# Altium PCB 16MV1.PcbDoc (part 3 of 3)
Units mm, origin at the board's own origin, x right, y up, seen from the top; angles counter-clockwise.
Board outline 48 x 32 mm, 4 copper layers (Top Layer, Layer 1, Layer 2, Bottom Layer), stack 1.743 mm thick; 202 components, 160 nets, 784 pads, 427 vias.
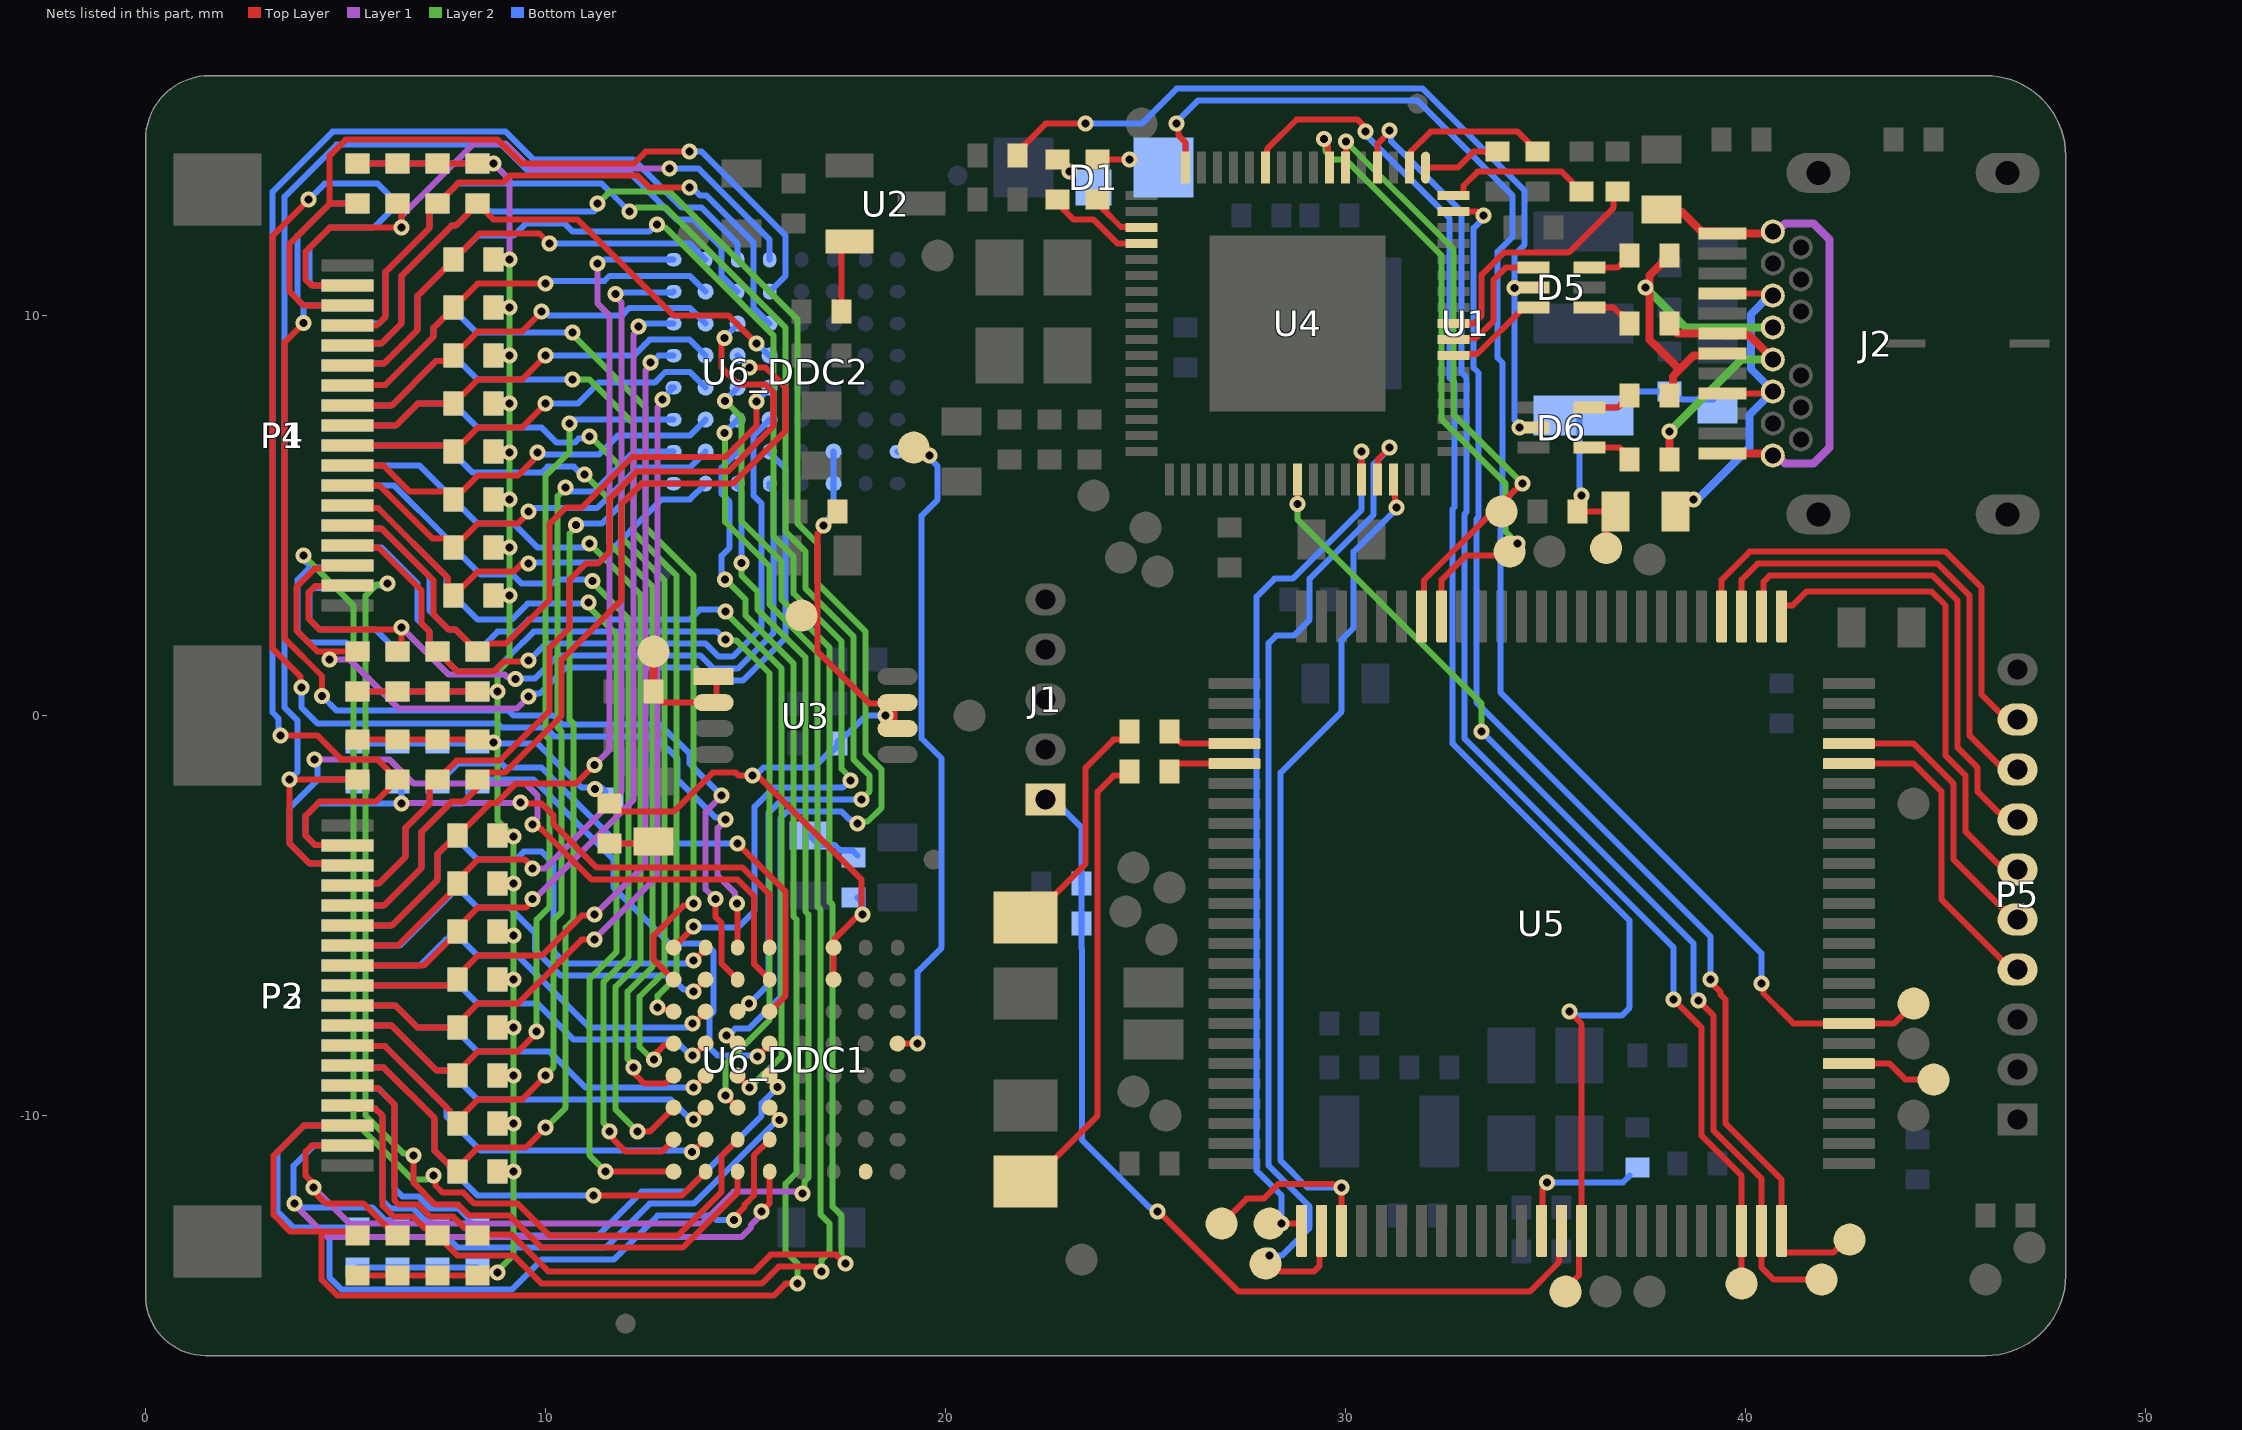
[diagram p4: the nets of this part, all layers, seen from the top]

## Via types
v1: diameter 0.4, hole 0.2, Top Layer to Bottom Layer, tented both sides, 427 vias

## Nets (pads, with @x,y where several pads share a name; then routed paths per layer and width w, separated by ;. In a path a pad name is that pad's centre, name@x,y a point inside that pad or via, vN(x,y) a via of type N, cw(c..) or ccw(c..) an arc to the next point about the centre after c; other vN are vias at no path point) (continued)
NetC39_DDC1_1: C39_DDC1.1 R51_DDC1.1 | length 1.4
  Bottom Layer w0.15: C39_DDC1.1@16.599,-3 16.833,-3.234 17.234,-3.234 17.375,-3.375 17.675,-3.375 R51_DDC1.1@17.8,-3.5
NetC39_DDC2_1: C39_DDC2.1 R51_DDC2.1 | length 1
  Top Layer w0.15: R51_DDC2.1@11.6,-3.2 C39_DDC2.1@12.6,-3.2
NetD1_2: D1.2 R7.1 | length 0.5
  Top Layer w0.15: R7.1@22.8,13.9 22.85,13.9 23.1,13.65 v1(23.1,13.6)
NetD1_3: D1.3 R6.1 | length 0.8
  Top Layer w0.15: R6.1@23.8,13.9 v1(24.6,13.9)
NetD3_1: D3.1 R12.1 | length 5.7
  Top Layer w0.15: D3.1@22,-5.05 22.15,-5.05 22.725,-4.475 23.5,-3.7 23.5,-1.3 24.2,-0.6 R12.1@24.5,-0.6
NetD4_1: D4.1 R13.1 | length 10.9
  Top Layer w0.15: D4.1@22.5,-11.3 22.725,-11.075 23.8,-10 23.8,-1.9 24.2,-1.5 R13.1@24.6,-1.5
NetD5_1: D5.1 R52.1 | length 1.1
  Top Layer w0.15: D5.1@36.1,10.2 36.7,10.2 36.875,10.025 36.925,10.025 37,9.95 R52.1@37,9.9
NetD5_3: D5.3 R53.1 | length 1
  Top Layer w0.15: D5.3@36.1,11.2 36.8,11.2 36.875,11.275 36.925,11.275 37,11.35 R53.1@37,11.4
NetD5_4: D5.4 U4.59 | length 3.1
  Top Layer w0.15: U4.59@32.7,9.4 32.735,9.435 33.259,9.435 33.7,9.876 33.7,10.9 34,11.2 D5.4@34.5,11.2
NetD5_6: D5.6 U4.58 | length 2.4
  Top Layer w0.15: U4.58@32.7,9 32.735,9.035 33.285,9.035 34.45,10.2 D5.6@34.6,10.2
NetD6_1: D6.1 R54.1 | length 0.9
  Top Layer w0.15: D6.1@36.1,6.7 36.85,6.7 36.95,6.6 R54.1@37,6.6
NetD6_3: D6.3 R55.1 | length 1
  Top Layer w0.15: D6.3@36.1,7.7 36.8,7.7 36.875,7.775 36.925,7.775 37,7.85 R55.1@37,7.9
NetFB1_1: FB1.1 J2.A1 J2.A12 J2.B1 J2.B12 | length 12.6
  Top Layer w0.2: FB1.1@37.9,12.6 38.4,12.6 38.9,12.1 39.37,12.1 J2.A12@39.42,12.05 40.55,12.05 J2.B1@40.6,12 ; J2.A1@39.42,6.55 40.55,6.55 J2.B12@40.6,6.5
  Layer 1 w0.2: J2.B12@40.68,6.5 40.788,6.5 40.988,6.3 41.7,6.3 42.1,6.7 42.1,11.9 41.7,12.3 40.988,12.3 40.865,12.177 40.723,12.177 J2.B1@40.7,12.2
NetFB2_2: FB2.2 J2.A4 J2.A9 J2.B4 J2.B9 | length 8.9
  Top Layer w0.15: J2.A4@39.42,8.05 40.55,8.05 J2.B9@40.6,8.1 ; J2.A9@39.42,10.55 40.55,10.55 J2.B4@40.6,10.5
  Layer 1 w0.2: J2.B9@40.603,8.177 J2.B9@40.68,8.1
  Bottom Layer w0.2: v1(38.7,5.4) 38.8,5.4 40.1,6.7 40.1,7.52 J2.B9@40.68,8.1 40.68,8.122 40.13,8.672 40.13,10.03 J2.B4@40.6,10.5
NetP1_2: P1.2 R18_DDC2.1 U6_DDC2.H4 | length 16.8
  Top Layer w0.15: P1.2@5.05,10.75 4.15,10.75 4,10.9 4,11.6 4.6,12.2 v1(6.4,12.2) ; R18_DDC2.1@6.3,12.8 6.4,12.7 6.4,12.288 v1@6.356,12.244
  Layer 1 w0.15: v1(6.4,12.2) 6.401,12.501 8.2,14.3 9,14.3 9.625,13.675 v1(13.1,13.675)
  Bottom Layer w0.15: v1(13.1,13.675) 13.825,13.675 15.6,11.9 U6_DDC2.H4@15.6,11.4
NetP1_3: P1.3 R19_DDC2.1 U6_DDC2.G4 | length 20.4
  Top Layer w0.15: P1.3@5.05,10.25 3.95,10.25 3.6,10.6 3.6,11.8 4.6,12.8 ; R19_DDC2.1@5.2,12.8 4.6,12.8 ; v1(13.6,14.1) 12.5,14.1 12.2,13.8 9.4,13.8 8.8,14.4 5,14.4 4.6,14 4.6,12.8
  Bottom Layer w0.15: v1(13.6,14.1) 13.901,14.099 16,12 16,11 U6_DDC2.G4@15.6,10.6
NetP1_4: P1.4 R20_DDC2.1 U6_DDC2.F4 | length 15.5
  Top Layer w0.15: P1.4@5.05,9.75 5.054,9.754 5.778,9.754 6,9.976 6,11.1 7.1,12.2 7.1,12.65 7.25,12.8 R20_DDC2.1@7.3,12.8 7.35,12.8 7.525,12.975 7.525,13.025 7.825,13.325 8.925,13.325 9.1,13.5 12.3,13.5 12.6,13.2 v1(13.601,13.201)
  Bottom Layer w0.15: v1(13.601,13.201) 13.668,13.201 13.869,13 14.024,13 15.2,11.824 15.2,10.2 U6_DDC2.F4@15.6,9.8
NetP1_5: P1.5 R21_DDC2.1 U6_DDC2.E4 | length 14.3
  Top Layer w0.15: P1.5@5.05,9.25 5.1,9.3 5.89,9.3 6.4,9.81 6.4,11 7.65,12.25 7.75,12.25 8.1,12.6 8.1,12.65 R21_DDC2.1@8.25,12.8 ; R21_DDC2.1@8.3,12.8 R21_DDC2.1@8.4,12.9 ; R21_DDC2.1@8.4,12.7 8.45,12.7 8.525,12.625 8.525,12.575 8.7,12.4 10.8,12.4 13.2,10 14.574,10 v1(15.275,9.299) v1@15.3,9.324
  Bottom Layer w0.15: v1(15.275,9.299) 15.288,9.299 15.587,9 U6_DDC2.E4@15.6,9
NetP1_6: P1.6 R22_DDC2.1 U6_DDC2.H2 | length 11
  Top Layer w0.15: P1.6@5.05,8.75 5.1,8.8 5.956,8.8 6.8,9.644 6.8,10.5 7.475,11.175 7.525,11.175 7.6,11.25 R22_DDC2.1@7.6,11.3 ; R22_DDC2.1@7.7,11.4 7.7,11.45 7.875,11.625 7.925,11.625 8.352,12.052 9.848,12.052 v1(10.1,11.8)
  Bottom Layer w0.15: v1(10.1,11.8) 13.6,11.8 U6_DDC2.H2@14,11.4
NetP1_7: P1.7 R23_DDC2.1 U6_DDC2.G2 | length 10.4
  Top Layer w0.15: P1.7@5.05,8.25 5.062,8.262 5.983,8.262 7.2,9.479 7.2,9.7 7.5,10 7.55,10 7.7,10.15 R23_DDC2.1@7.7,10.2 7.7,10.25 7.875,10.425 7.925,10.425 8.3,10.8 v1(10,10.8)
  Bottom Layer w0.15: v1(10,10.8) 10.071,10.871 11.472,10.871 11.596,10.995 13.605,10.995 U6_DDC2.G2@14,10.6
NetP1_8: P1.8 R24_DDC2.1 U6_DDC2.F2 | length 10.2
  Top Layer w0.15: P1.8@5.05,7.75 6.15,7.75 7.267,8.867 7.667,8.867 R24_DDC2.1@7.7,8.9 ; R24_DDC2.1@7.7,9 7.7,9.05 7.875,9.225 7.925,9.225 8.3,9.6 9.4,9.6 v1(9.9,10.1)
  Bottom Layer w0.15: v1(9.9,10.1) 9.968,10.1 10.068,10 11.9,10 12.095,10.195 13.605,10.195 U6_DDC2.F2@14,9.8
NetP1_9: P1.9 R25_DDC2.1 U6_DDC2.E2 | length 10
  Top Layer w0.15: P1.9@5.05,7.25 6.25,7.25 6.8,7.8 R25_DDC2.1@7.7,7.8 7.7,7.85 7.875,8.025 7.925,8.025 8.3,8.4 9.4,8.4 v1(10,9)
  Bottom Layer w0.15: v1(10,9) 12.2,9 12.475,9.275 ; 12.476,9.275 12.601,9.4 13.6,9.4 U6_DDC2.E2@14,9
NetP1_10: P1.10 R26_DDC2.1 U6_DDC2.D2 | length 10
  Top Layer w0.15: P1.10@5.05,6.75 7.55,6.75 R26_DDC2.1@7.7,6.6 7.7,6.65 7.875,6.825 7.925,6.825 8.3,7.2 9.4,7.2 v1(10,7.8)
  Bottom Layer w0.15: v1(10,7.8) 10.8,7.8 11.325,8.325 12.727,8.325 12.997,8.595 13.605,8.595 U6_DDC2.D2@14,8.2
NetP1_11: P1.11 R27_DDC2.1 U6_DDC2.C2 | length 10.1
  Top Layer w0.15: P1.11@5.05,6.25 5.95,6.25 6.6,5.6 7.55,5.6 7.6,5.55 R27_DDC2.1@7.6,5.5 ; R27_DDC2.1@7.7,5.4 7.7,5.45 7.875,5.625 7.925,5.625 8.3,6 9.3,6 9.699,6.399 9.699,6.432 9.8,6.532 v1(9.8,6.575)
  Bottom Layer w0.15: v1(9.8,6.575) 9.848,6.527 10.149,6.527 10.151,6.525 11.325,6.525 11.8,7 13.6,7 U6_DDC2.C2@14,7.4
NetP1_12: P1.12 R28_DDC2.1 U6_DDC2.B2 | length 10.5
  Top Layer w0.15: P1.12@5.05,5.75 5.85,5.75 7.175,4.425 7.525,4.425 7.6,4.35 R28_DDC2.1@7.6,4.3 ; R28_DDC2.1@7.7,4.2 7.7,4.25 7.875,4.425 7.925,4.425 8.3,4.8 9.3,4.8 9.575,5.075 v1(9.575,5.1)
  Bottom Layer w0.15: v1(9.575,5.1) 9.6,5.1 9.689,5.189 11.289,5.189 12.3,6.2 13.6,6.2 U6_DDC2.B2@14,6.6
NetP1_13: P1.13 R29_DDC2.1 U6_DDC2.A2 | length 11.2
  Top Layer w0.15: P1.13@5.05,5.25 5.109,5.191 5.809,5.191 7.566,3.434 7.566,3.134 R29_DDC2.1@7.7,3 ; R29_DDC2.1@7.7,3.05 7.85,3.2 7.9,3.2 8.3,3.6 9.2,3.6 9.4,3.8 v1(9.575,3.8)
  Bottom Layer w0.15: v1(9.575,3.8) 9.6,3.825 11.325,3.825 12.905,5.405 13.605,5.405 U6_DDC2.A2@14,5.8
NetP1_14: P1.14 R30_DDC2.1 U6_DDC2.D4 | length 16.6
  Top Layer w0.15: P1.14@5.05,4.75 5.125,4.675 5.901,4.675 7.2,3.376 7.2,2.526 7.576,2.15 7.75,2.15 8.075,1.825 8.075,1.775 8.25,1.6 R30_DDC2.1@8.3,1.6 8.475,1.775 8.588,1.775 8.613,1.8 9.006,1.8 10.1,2.894 10.1,4.8 10.5,5.2 10.9,5.2 12.16,6.46 14.487,6.46 15.275,7.248 v1(15.275,7.85)
  Bottom Layer w0.15: v1(15.275,7.85) 15.275,7.862 15.6,8.187 U6_DDC2.D4@15.6,8.2
NetP1_15: P1.15 R31_DDC2.1 U6_DDC2.C4 | length 18.4
  Top Layer w0.15: P1.15@5.05,4.25 5.1,4.2 5.824,4.2 6.9,3.124 6.9,2.3 7.1,2.1 7.1,1.75 7.15,1.7 R31_DDC2.1@7.2,1.7 ; R31_DDC2.1@7.3,1.6 7.35,1.6 7.525,1.425 7.525,1.375 7.8,1.1 8.7,1.1 8.952,1.352 9.551,1.352 v1(9.574,1.375)
  Bottom Layer w0.15: v1(9.574,1.375) v1@9.599,1.401 ; v1@9.601,1.401 10,1.8 13.999,1.8 14.324,1.475 14.676,1.475 15.4,2.199 15.4,5.3 15.2,5.5 15.2,7 U6_DDC2.C4@15.6,7.4
NetP1_16: P1.16 R32_DDC2.1 U6_DDC2.B4 | length 22.3
  Top Layer w0.15: v1(4.601,1.4) 4.6,1.401 4.6,1.6 ; P1.16@5.05,3.75 4.975,3.675 4.226,3.675 3.775,3.224 3.775,2.125 4.3,1.6 4.6,1.6 ; R32_DDC2.1@5.3,1.6 4.6,1.6
  Layer 1 w0.15: v1(4.601,1.4) 5.1,1.4 6.325,0.175 9.275,0.175 9.575,0.475 v1(9.575,0.48)
  Bottom Layer w0.15: v1(9.575,0.48) 9.643,0.548 9.848,0.548 10.5,1.2 13.75,1.2 14.075,0.875 14.925,0.875 16,1.95 16,6.17 15.6,6.57 U6_DDC2.B4@15.6,6.6
NetP1_17: P1.17 R33_DDC2.1 U6_DDC2.A4 | length 19.1
  Top Layer w0.15: P1.17@5.05,3.25 5.038,3.238 4.238,3.238 4.075,3.075 4.075,2.425 4.35,2.15 6.312,2.15 v1@6.331,2.132 ; R33_DDC2.1@6.3,1.6 6.4,1.7 6.4,2.132 6.4,2.199 v1(6.399,2.2)
  Layer 1 w0.15: v1@6.4,2.2 7.575,1.025 8.976,1.025 9.032,0.969 9.199,0.969 v1(9.246,0.921)
  Bottom Layer w0.15: v1(9.246,0.921) 9.25,0.925 9.725,0.925 10.3,1.5 13.875,1.5 14.2,1.175 14.8,1.175 15.7,2.075 15.7,5.619 15.6,5.719 U6_DDC2.A4@15.6,5.8
NetP2_2: P2.2 R34_DDC2.1 U6_DDC2.H3 | length 35
  Top Layer w0.15: v1(3.375,-0.5) 4.3,-0.5 4.9,-1.1 5.8,-1.1 6.075,-1.375 6.075,-1.425 6.25,-1.6 R34_DDC2.1@6.3,-1.6 ; P2.2@5.05,-3.25 5.038,-3.238 4.238,-3.238 4,-3 4,-2.5 4.35,-2.15 5.75,-2.15 6.1,-1.8 R34_DDC2.1@6.1,-1.7
  Bottom Layer w0.15: v1(3.375,-0.5) 3.327,-0.452 3.327,-0.076 3.175,0.076 3.175,13.099 4.676,14.6 9,14.6 9.7,13.9 12.2,13.9 13.4,12.7 13.9,12.7 14.8,11.8 U6_DDC2.H3@14.8,11.4
NetP2_3: P2.3 R35_DDC2.1 U6_DDC2.G3 | length 33.5
  Top Layer w0.15: P2.3@5.05,-3.75 5,-3.7 4.1,-3.7 3.6,-3.2 3.6,-1.7 3.7,-1.6 R35_DDC2.1@5.3,-1.6
  Bottom Layer w0.15: v1(3.6,-1.6) 3.8,-1.4 3.8,-0.124 3.475,0.201 3.475,12.975 4.775,14.275 8.901,14.275 9.576,13.6 12.076,13.6 13.276,12.4 13.7,12.4 14.395,11.705 14.395,11.005 U6_DDC2.G3@14.8,10.6
NetP2_4: P2.4 R36_DDC2.1 U6_DDC2.F3 | length 22.1
  Top Layer w0.15: P2.4@5.05,-4.25 5.1,-4.2 5.824,-4.2 6.5,-3.524 6.5,-2.8 7.1,-2.2 7.1,-1.75 7.15,-1.7 R36_DDC2.1@7.2,-1.7 ; R36_DDC2.1@7.3,-1.6 7.35,-1.6 7.525,-1.425 7.525,-1.375 7.775,-1.125 8.851,-1.125 10.1,0.124 10.1,1.7 10.6,2.2 10.6,3.4 11,3.8 11.3,3.8 11.6,4.1 11.6,5.424 12.276,6.1 14.551,6.1 15.7,7.249 15.7,8.076 15.501,8.275 15.276,8.275 14.825,8.275 14.4,8.7 14.4,9.312 14.47,9.382 v1(14.47,9.44)
  Bottom Layer w0.15: v1@14.5,9.4 14.5,9.478 14.8,9.778 U6_DDC2.F3@14.8,9.8
NetP2_5: P2.5 R37_DDC2.1 U6_DDC2.E3 | length 21.1
  Top Layer w0.15: P2.5@5.05,-4.75 5.95,-4.75 6.9,-3.8 6.9,-2.9 7.65,-2.15 7.95,-2.15 R37_DDC2.1@8.3,-1.8 ; R37_DDC2.1@8.3,-1.6 8.475,-1.425 8.975,-1.425 10.4,0 10.4,1.4 11.9,2.9 11.9,5.3 12.4,5.8 14.676,5.8 16,7.124 16,8.2 15.5,8.7 v1(15.1,8.7)
  Bottom Layer w0.15: U6_DDC2.E3@14.8,9 v1(15.1,8.7)
NetP2_6: P2.6 R38_DDC2.1 U6_DDC2.H1 | length 22.9
  Top Layer w0.15: P2.6@5.05,-5.25 6.15,-5.25 7.3,-4.1 7.3,-3.45 7.65,-3.1 R38_DDC2.1@7.7,-3.1 ; R38_DDC2.1@7.7,-2.95 7.875,-2.775 8.025,-2.775 8.613,-2.187 8.761,-2.187 9.249,-1.7 10.757,-1.7 v1(11.225,-1.232)
  Layer 1 w0.15: v1(11.225,-1.232) 11.6,-0.857 11.6,10 11.3,10.3 v1@11.3,11.299
  Bottom Layer w0.15: v1(11.299,11.299) 11.368,11.3 11.468,11.4 U6_DDC2.H1@13.2,11.4
NetP2_7: P2.7 R39_DDC2.1 U6_DDC2.G1 | length 22.7
  Top Layer w0.15: P2.7@5.05,-5.75 6.3,-5.75 7.625,-4.425 7.7,-4.35 R39_DDC2.1@7.7,-4.3 ; R39_DDC2.1@7.7,-4.2 7.7,-4.15 7.875,-3.975 7.925,-3.975 8.3,-3.6 9.487,-3.6 9.675,-3.788 v1(9.675,-3.825)
  Layer 1 w0.15: v1(9.675,-3.825) 9.976,-3.824 11.9,-1.9 11.9,10.325 11.746,10.479 v1(11.746,10.546)
  Bottom Layer w0.15: v1(11.746,10.546) 11.773,10.573 13.173,10.573 U6_DDC2.G1@13.2,10.6
NetP2_8: P2.8 R40_DDC2.1 U6_DDC2.F1 | length 21.3
  Top Layer w0.15: P2.8@5.05,-6.25 6.95,-6.25 7.575,-5.625 7.625,-5.625 7.7,-5.55 R40_DDC2.1@7.7,-5.5 ; R40_DDC2.1@7.925,-5.175 8.3,-4.8 9.5,-4.8 9.675,-4.625 v1(9.675,-4.587)
  Layer 1 w0.15: v1(9.675,-4.587) 9.713,-4.587 12.2,-2.1 12.2,9.531 12.325,9.656 v1(12.325,9.723)
  Bottom Layer w0.15: v1(12.325,9.723) 12.391,9.723 12.468,9.8 U6_DDC2.F1@13.2,9.8
NetP2_9: P2.9 R41_DDC2.1 U6_DDC2.E1 | length 22
  Top Layer w0.15: P2.9@5.05,-6.75 7.55,-6.75 7.7,-6.6 7.7,-6.55 7.875,-6.375 7.925,-6.375 8.3,-6 9.9,-6 10.899,-5.001 11.198,-5.001 v1(11.225,-4.974)
  Layer 1 w0.15: v1@11.226,-4.974 12.5,-3.7 12.5,8.631 12.625,8.756 v1(12.625,8.824)
  Bottom Layer w0.15: v1(12.625,8.824) 12.652,8.824 12.828,9 U6_DDC2.E1@13.2,9
NetP2_10: P2.10 R42_DDC2.1 U6_DDC2.D1 | length 22
  Top Layer w0.15: P2.10@5.05,-7.25 6.25,-7.25 6.8,-7.8 7.7,-7.8 7.7,-7.75 7.875,-7.575 7.925,-7.575 8.3,-7.2 9.3,-7.2 9.8,-6.7 10.899,-5.601 v1(11.225,-5.6)
  Layer 1 w0.15: v1(11.225,-5.6) 11.225,-5.575 12.8,-4 12.8,7.707 12.925,7.832 v1(12.925,7.9)
  Bottom Layer w0.15: v1@13,7.9 12.993,7.907 12.993,7.995 U6_DDC2.D1@13.198,8.2 ; U6_DDC2.D1@13.119,8.2 U6_DDC2.D1@13.198,8.2 ; U6_DDC2.D1@13.215,8.2 U6_DDC2.D1@13.2,8.2 U6_DDC2.D1@13.198,8.2
NetP2_11: P2.11 R43_DDC2.1 U6_DDC2.C1 | length 24
  Top Layer w0.15: P2.11@5.05,-7.75 6.15,-7.75 7.267,-8.867 7.667,-8.867 R43_DDC2.1@7.7,-8.9 ; R43_DDC2.1@7.7,-9 7.7,-8.95 7.875,-8.775 7.925,-8.775 8.3,-8.4 9.3,-8.4 9.775,-7.925 v1(9.775,-7.9)
  Layer 2 w0.15: v1(9.775,-7.9) 9.775,-5.101 10.1,-4.776 10.1,-0.6 10,-0.5 10,6 10.6,6.6 v1(10.6,7.3)
  Bottom Layer w0.15: v1(10.6,7.3) 10.7,7.4 U6_DDC2.C1@13.2,7.4
NetP2_12: P2.12 R44_DDC2.1 U6_DDC2.B1 | length 24.5
  Top Layer w0.15: P2.12@5.05,-8.25 5.062,-8.262 5.983,-8.262 7.625,-9.904 7.625,-10.125 R44_DDC2.1@7.7,-10.2 ; R44_DDC2.1@7.7,-10.15 7.875,-9.975 7.925,-9.975 8.3,-9.6 9.4,-9.6 v1(10,-9)
  Layer 2 w0.15: v1(10,-9) 10,-8.987 10.2,-8.787 10.2,-5.1 10.4,-4.9 10.4,-0.4 10.3,-0.3 10.3,5.487 10.5,5.687 v1(10.5,5.7)
  Bottom Layer w0.15: v1(10.5,5.7) 10.6,5.6 11.2,5.6 12.2,6.6 U6_DDC2.B1@13.2,6.6
NetP2_13: P2.13 R45_DDC2.1 U6_DDC2.A1 | length 25.2
  Top Layer w0.15: P2.13@5.05,-8.75 5.1,-8.8 5.956,-8.8 7.225,-10.069 7.225,-10.875 7.525,-11.175 R45_DDC2.1@7.6,-11.25 ; R45_DDC2.1@7.7,-11.4 7.7,-11.35 7.875,-11.175 7.925,-11.175 8.3,-10.8 9.5,-10.8 v1(10,-10.3)
  Layer 2 w0.15: v1(10,-10.3) 10.5,-9.8 10.5,-5.3 10.7,-5.1 10.7,-0.2 10.6,-0.1 10.6,4.551 10.754,4.705 v1(10.754,4.764)
  Bottom Layer w0.15: v1(10.754,4.764) 10.789,4.8 11.4,4.8 12.4,5.8 U6_DDC2.A1@13.2,5.8
NetP2_14: P2.14 R46_DDC2.1 U6_DDC2.D3 | length 39.3
  Top Layer w0.15: P2.14@5.05,-9.25 5.109,-9.309 5.809,-9.309 6.225,-9.725 6.225,-12.126 6.324,-12.225 6.817,-12.225 7.117,-12.525 7.501,-12.525 7.693,-12.525 7.993,-12.825 8.075,-12.825 8.225,-12.975 9.151,-12.975 10.076,-13.9 15.2,-13.9 15.625,-13.475 17.262,-13.475 17.487,-13.7 v1(17.5,-13.7)
  Layer 2 w0.15: v1(14.484,7.867) 14.9,7.451 14.9,4.851 15.9,3.851 15.9,2.899 17.1,1.699 17.1,-4.655 17.175,-4.73 17.175,-12.275 17.4,-12.5 17.4,-13.532 17.5,-13.632 v1(17.5,-13.7)
  Bottom Layer w0.15: v1@14.484,7.884 U6_DDC2.D3@14.8,8.2
NetP2_15: P2.15 R47_DDC2.1 U6_DDC2.C3 | length 37.6
  Top Layer w0.15: P2.15@5.05,-9.75 5.125,-9.825 5.743,-9.825 5.925,-10.007 5.925,-12.251 6.199,-12.525 6.693,-12.525 6.993,-12.825 7.075,-12.825 R47_DDC2.1@7.275,-13.025 ; R47_DDC2.1@7.525,-13.225 7.8,-13.5 9.2,-13.5 9.9,-14.2 15.4,-14.2 15.825,-13.775 16.707,-13.775 16.832,-13.9 v1(16.9,-13.9)
  Layer 2 w0.15: v1(14.475,7.067) 14.484,7.058 14.484,4.843 15.6,3.727 15.6,2.775 16.8,1.575 16.8,-4.779 16.875,-4.854 16.875,-12.475 17.1,-12.7 17.1,-13.4 16.901,-13.599 v1@16.901,-13.999
  Bottom Layer w0.15: v1(14.475,7.067) 14.475,7.071 14.8,7.396 U6_DDC2.C3@14.8,7.4
NetP2_16: P2.16 R48_DDC2.1 U6_DDC2.B3 | length 41.4
  Top Layer w0.15: P2.16@5.05,-10.25 3.95,-10.25 3.2,-11 3.2,-12.483 3.617,-12.9 4.4,-12.9 ; R48_DDC2.1@5.3,-13 5.2,-12.9 4.4,-12.9 ; v1@16.199,-14.201 15.999,-14.201 15.7,-14.5 4.8,-14.5 4.4,-14.1 4.4,-12.9
  Layer 2 w0.15: v1(14.49,3.398) 14.502,3.398 15,2.9 15,2.5 16.2,1.3 16.2,-5.028 16.272,-5.1 16.272,-11.428 16,-11.7 16,-13.4 16.3,-13.7 v1(16.3,-14.2)
  Bottom Layer w0.15: v1(14.49,3.398) 14.49,3.465 14.4,3.555 14.4,4 14.6,4.2 14.6,5.342 14.4,5.542 14.4,6.2 U6_DDC2.B3@14.8,6.6
NetP2_17: P2.17 R49_DDC2.1 U6_DDC2.A3 | length 36
  Top Layer w0.15: v1(4.2,-11.8) 4.2,-11.868 4.301,-11.968 4.301,-12.001 4.5,-12.2 5.45,-12.2 6.1,-12.85 R49_DDC2.1@6.1,-12.9 ; v1@4.25,-11.75 4,-11.5 4,-10.9 4.15,-10.75 P2.17@5.05,-10.75
  Layer 1 w0.15: v1(4.2,-11.8) 5.1,-12.7 13.9,-12.7 14.7,-11.9 16.35,-11.9 16.4,-11.95 v1(16.425,-11.95)
  Layer 2 w0.15: v1(14.903,3.812) 14.903,3.497 15.3,3.1 15.3,2.651 16.5,1.451 16.5,-4.903 16.572,-4.976 16.572,-11.552 16.473,-11.651 16.473,-11.835 v1@16.407,-11.9
  Bottom Layer w0.15: U6_DDC2.A3@14.8,5.8 14.8,5.719 14.9,5.619 14.9,3.815 v1(14.903,3.812)
NetP3_2: P3.2 R18_DDC1.1 U6_DDC1.H4 | length 18.8
  Top Layer w0.15: v1(15.401,-12.401) 15.401,-12.386 15.6,-12.187 U6_DDC1.H4@15.6,-11.4
  Layer 1 w0.15: v1(3.725,-12.199) 3.725,-12.225 4.538,-13.038 14.889,-13.038 15.138,-12.789 15.138,-12.732 15.401,-12.469 v1(15.401,-12.401)
  Bottom Layer w0.15: v1@3.701,-12.2 3.768,-12.2 3.868,-12.3 5.676,-12.3 6.001,-12.625 6.125,-12.625 R18_DDC1.1@6.3,-12.8 ; v1(3.725,-12.199) 3.7,-12.174 3.7,-11.25 4.2,-10.75 P3.2@5.05,-10.75
NetP3_3: P3.3 R19_DDC1.1 U6_DDC1.G4 | length 20.3
  Top Layer w0.15: v1(14.713,-12.613) 14.713,-12.545 14.976,-12.282 14.976,-12.225 15.205,-11.996 15.205,-10.995 U6_DDC1.G4@15.6,-10.6
  Bottom Layer w0.15: P3.3@5.05,-10.25 3.95,-10.25 3.3,-10.9 3.3,-12.4 3.7,-12.8 4.6,-12.8 ; R19_DDC1.1@5.2,-12.8 4.6,-12.8 ; v1(14.713,-12.613) 14.275,-12.613 14.213,-12.551 14.201,-12.551 14.151,-12.5 12.8,-12.5 11.7,-13.6 9.9,-13.6 9.15,-14.35 4.9,-14.35 4.6,-14.05 4.6,-12.8
NetP3_4: P3.4 R20_DDC1.1 U6_DDC1.F4 | length 15.3
  Top Layer w0.15: U6_DDC1.F4@15.6,-9.8 15.6,-9.833 15.8,-10.033 v1@15.8,-10.1
  Bottom Layer w0.15: P3.4@5.05,-9.75 5.125,-9.825 5.743,-9.825 5.925,-10.007 5.925,-12.125 6.125,-12.325 6.693,-12.325 6.993,-12.625 7.075,-12.625 7.2,-12.75 R20_DDC1.1@7.2,-12.8 ; R20_DDC1.1@7.25,-12.7 7.5,-12.95 7.5,-13 7.8,-13.3 11.5,-13.3 12.6,-12.2 13.7,-12.2 15.75,-10.15 15.81,-10.15 v1(15.847,-10.113)
NetP3_5: P3.5 R21_DDC1.1 U6_DDC1.E4 | length 15.7
  Top Layer w0.15: U6_DDC1.E4@15.6,-9 15.6,-9.044 15.8,-9.244 v1(15.8,-9.288)
  Bottom Layer w0.15: P3.5@5.05,-9.25 5.125,-9.325 5.825,-9.325 6.225,-9.725 6.225,-11.825 6.425,-12.025 6.825,-12.025 7.125,-12.325 7.825,-12.325 8.075,-12.575 8.075,-12.625 8.25,-12.8 R21_DDC1.1@8.3,-12.8 8.475,-12.975 8.588,-12.975 8.613,-13 11.3,-13 12.4,-11.9 13.5,-11.9 15.4,-10 15.4,-9.688 v1(15.8,-9.288)
NetP3_6: P3.6 R22_DDC1.1 U6_DDC1.H2 | length 10.8
  Top Layer w0.15: v1(11.2,-12) 13.4,-12 U6_DDC1.H2@13.9,-11.5
  Bottom Layer w0.15: P3.6@5.05,-8.75 5.1,-8.8 5.956,-8.8 7.225,-10.069 7.225,-10.875 7.6,-11.25 R22_DDC1.1@7.6,-11.3 ; R22_DDC1.1@7.7,-11.4 7.7,-11.45 7.85,-11.6 7.9,-11.6 8.3,-12 v1(11.2,-12)
NetP3_7: P3.7 R23_DDC1.1 U6_DDC1.G2 | length 10.4
  Top Layer w0.15: v1(13.658,-10.905) 13.676,-10.905 U6_DDC1.G2@13.909,-10.672 ; U6_DDC1.G2@13.9,-10.6 13.909,-10.609 U6_DDC1.G2@13.909,-10.672 ; U6_DDC1.G2@14,-10.6 13.981,-10.6 U6_DDC1.G2@13.909,-10.672
  Bottom Layer w0.15: P3.7@5.05,-8.25 5.062,-8.262 5.983,-8.262 7.2,-9.479 7.525,-9.804 7.525,-10.025 7.7,-10.2 7.7,-10.25 7.85,-10.4 7.9,-10.4 8.375,-10.875 13.628,-10.875 v1(13.658,-10.905)
NetP3_8: P3.8 R24_DDC1.1 U6_DDC1.F2 | length 10
  Top Layer w0.15: v1(13.7,-10.1) U6_DDC1.F2@13.918,-9.882 ; U6_DDC1.F2@13.9,-9.8 13.918,-9.818 U6_DDC1.F2@13.918,-9.882 ; U6_DDC1.F2@14,-9.9 13.982,-9.882 U6_DDC1.F2@13.918,-9.882
  Bottom Layer w0.15: P3.8@5.05,-7.75 6.15,-7.75 7.267,-8.867 7.667,-8.867 R24_DDC1.1@7.7,-8.9 ; R24_DDC1.1@7.7,-9.05 7.85,-9.2 7.9,-9.2 8.3,-9.6 13.132,-9.6 13.632,-10.1 v1(13.7,-10.1)
NetP3_9: P3.9 R25_DDC1.1 U6_DDC1.E2 | length 9.8
  Top Layer w0.15: v1(13.7,-9.3) U6_DDC1.E2@13.9,-9.1
  Bottom Layer w0.15: P3.9@5.05,-7.25 6.25,-7.25 6.8,-7.8 7.7,-7.8 7.7,-7.85 7.85,-8 7.9,-8 8.3,-8.4 10.1,-8.4 11,-9.3 v1(13.7,-9.3)
NetP3_10: P3.10 R26_DDC1.1 U6_DDC1.D2 | length 10
  Top Layer w0.15: v1(13.675,-8.5) 13.688,-8.5 13.988,-8.2 U6_DDC1.D2@14,-8.2
  Bottom Layer w0.15: P3.10@5.05,-6.75 7.55,-6.75 7.7,-6.6 7.7,-6.65 7.85,-6.8 7.9,-6.8 8.3,-7.2 9.8,-7.2 10.7,-8.1 13.232,-8.1 13.632,-8.5 v1(13.675,-8.5)
NetP3_11: P3.11 R27_DDC1.1 U6_DDC1.C2 | length 10.4
  Top Layer w0.15: v1(13.675,-7.7) 13.688,-7.7 13.988,-7.4 U6_DDC1.C2@14,-7.4
  Bottom Layer w0.15: P3.11@5.05,-6.25 6.85,-6.25 7.5,-5.6 7.55,-5.6 7.6,-5.55 R27_DDC1.1@7.6,-5.5 ; R27_DDC1.1@7.7,-5.4 7.7,-5.45 7.85,-5.6 7.9,-5.6 8.3,-6 9.3,-6 11.1,-7.8 13.532,-7.8 13.632,-7.7 v1(13.675,-7.7)
NetP3_12: P3.12 R28_DDC1.1 U6_DDC1.B2 | length 11.1
  Top Layer w0.15: v1(13.7,-6.9) 13.982,-6.618 U6_DDC1.B2@14.018,-6.618
  Bottom Layer w0.15: P3.12@5.05,-5.75 6.35,-5.75 7.625,-4.475 7.625,-4.425 7.755,-4.295 R28_DDC1.1@7.805,-4.295 ; R28_DDC1.1@7.775,-4.325 7.85,-4.4 7.9,-4.4 8.3,-4.8 9.1,-4.8 9.738,-5.438 9.738,-5.862 10.376,-6.5 13.1,-6.5 13.452,-6.852 13.652,-6.852 v1(13.7,-6.9)
NetP3_13: P3.13 R29_DDC1.1 U6_DDC1.A2 | length 13.1
  Top Layer w0.15: v1(13.7,-6.125) 13.703,-6.125 14,-5.827 U6_DDC1.A2@14,-5.815
  Bottom Layer w0.15: P3.13@5.05,-5.25 6.15,-5.25 7.3,-4.1 7.3,-3.45 7.65,-3.1 R29_DDC1.1@7.7,-3.1 ; R29_DDC1.1@7.7,-3.05 7.85,-3.2 7.9,-3.2 8.3,-3.6 9.25,-3.6 9.45,-3.4 9.9,-3.4 10.2,-3.7 10.2,-5.9 10.5,-6.2 13.557,-6.2 13.632,-6.125 v1(13.7,-6.125)
NetP3_14: P3.14 R30_DDC1.1 U6_DDC1.D4 | length 17.2
  Top Layer w0.15: v1(15.292,-8.525) 15.292,-8.52 15.5,-8.312 U6_DDC1.D4@15.5,-8.3
  Bottom Layer w0.15: P3.14@5.05,-4.75 5.95,-4.75 6.9,-3.8 6.9,-2.9 7.6,-2.2 7.9,-2.2 8.075,-2.025 8.075,-1.875 8.15,-1.8 R30_DDC1.1@8.3,-1.8 ; R30_DDC1.1@8.3,-1.6 9.7,-1.6 11.7,-3.6 11.7,-4.3 13.1,-5.7 14,-5.7 14.2,-5.9 14.2,-7.4 14.1,-7.5 14.1,-8.3 14.3,-8.5 15.1,-8.5 15.106,-8.494 15.261,-8.494 v1(15.292,-8.525)
NetP3_15: P3.15 R31_DDC1.1 U6_DDC1.C4 | length 17.3
  Top Layer w0.15: v1(14.8,-3.2) 16,-4.4 16,-7 U6_DDC1.C4@15.6,-7.4
  Bottom Layer w0.15: P3.15@5.05,-4.25 5.1,-4.2 5.824,-4.2 6.5,-3.524 6.5,-2.8 7.1,-2.2 7.1,-1.75 7.15,-1.7 R31_DDC1.1@7.2,-1.7 ; R31_DDC1.1@7.3,-1.6 7.4,-1.6 7.8,-1.2 8.9,-1.2 9,-1.3 9.9,-1.3 11.8,-3.2 v1(14.8,-3.2)
NetP3_16: P3.16 R32_DDC1.1 U6_DDC1.B4 | length 20.3
  Top Layer w0.15: v1(9.675,-2.725) 9.768,-2.725 9.877,-2.834 9.892,-2.834 11.158,-4.1 14.801,-4.1 15.205,-4.504 15.205,-6.205 U6_DDC1.B4@15.6,-6.6
  Layer 1 w0.15: v1(4.225,-1.1) 6.1,-1.1 6.7,-1.7 9.5,-1.7 9.8,-2 9.8,-2.557 9.675,-2.682 v1(9.675,-2.725)
  Bottom Layer w0.15: v1(4.225,-1.1) 4.225,-1.168 4.3,-1.243 4.3,-1.6 ; P3.16@5.05,-3.75 5,-3.7 4.1,-3.7 3.6,-3.2 3.6,-2.3 4.3,-1.6 ; R32_DDC1.1@5.3,-1.6 4.3,-1.6
NetP3_17: P3.17 R33_DDC1.1 U6_DDC1.A4 | length 16.1
  Top Layer w0.15: v1(9.374,-2.176) 9.399,-2.2 9.9,-2.2 10.2,-2.5 10.2,-2.718 11.282,-3.8 14.925,-3.8 15.6,-4.475 U6_DDC1.A4@15.6,-5.7
  Layer 1 w0.15: v1(6.4,-2.2) 6.412,-2.187 9.363,-2.187 v1(9.374,-2.176)
  Bottom Layer w0.15: P3.17@5.05,-3.25 5.038,-3.238 4.238,-3.238 4,-3 4,-2.5 4.3,-2.2 6.285,-2.2 v1@6.331,-2.153 ; v1(6.4,-2.2) R33_DDC1.1@6.4,-1.7
NetP4_2: P4.2 R34_DDC1.1 U6_DDC1.H3 | length 30.9
  Top Layer w0.15: v1(6.7,-11) 6.7,-11.683 7.242,-12.225 7.817,-12.225 8.092,-12.5 9.1,-12.5 9.9,-13.3 13.424,-13.3 14.8,-11.924 U6_DDC1.H3@14.8,-11.4
  Layer 2 w0.15: v1(6.05,3.3) 6.024,3.274 5.774,3.274 5.5,3 5.5,-10 6.452,-10.952 6.652,-10.952 v1(6.7,-11)
  Bottom Layer w0.15: v1(6.05,3.3) 6,3.3 5.95,3.25 P4.2@5.05,3.25 4.991,3.191 4.188,3.191 4.1,3.103 4.1,2.4 4.35,2.15 5.75,2.15 6.1,1.8 R34_DDC1.1@6.1,1.7
NetP4_3: P4.3 R35_DDC1.1 U6_DDC1.G3 | length 31.9
  Top Layer w0.15: v1(7.2,-11.5) 7.248,-11.548 7.248,-11.748 7.425,-11.925 7.9,-11.925 7.942,-11.925 8.108,-12.092 8.217,-12.2 9.3,-12.2 10.1,-13 13.3,-13 14.4,-11.9 14.4,-11 U6_DDC1.G3@14.8,-10.6
  Layer 2 w0.15: v1(3.95,4) 5.2,2.75 5.2,-10.124 6.676,-11.6 7.032,-11.6 7.132,-11.5 v1(7.2,-11.5)
  Bottom Layer w0.15: v1(3.95,4) 3.95,3.894 4.1,3.744 4.1,3.7 ; P4.3@5.05,3.75 5,3.7 4.1,3.7 ; R35_DDC1.1@5.3,1.6 5.251,1.6 5.026,1.825 4.075,1.825 3.8,2.1 3.8,3.4 4.1,3.7
NetP4_4: P4.4 R36_DDC1.1 U6_DDC1.F3 | length 24.6
  Top Layer w0.15: v1(14.5,-9.5) U6_DDC1.F3@14.7,-9.7
  Layer 2 w0.15: v1(14.5,-9.5) 14.5,-8.7 15.6,-7.6 15.6,-6.3 15.6,1.051 14.776,1.875 14.525,1.875 v1(14.5,1.9)
  Bottom Layer w0.15: P4.4@5.05,4.25 5.1,4.2 5.9,4.2 6.8,3.3 6.8,2.4 7.1,2.1 7.1,1.75 7.15,1.7 R36_DDC1.1@7.2,1.7 ; R36_DDC1.1@7.3,1.6 7.35,1.6 7.525,1.425 7.525,1.375 7.8,1.1 8.698,1.1 9.423,1.826 ; 9.424,1.826 9.699,2.1 14.287,2.1 14.487,1.9 v1(14.5,1.9)
NetP4_5: P4.5 R37_DDC1.1 U6_DDC1.E3 | length 24.8
  Top Layer w0.15: U6_DDC1.E3@14.9,-9.1 v1(15.1,-9.3)
  Layer 2 w0.15: v1(14.501,2.601) 14.501,2.575 15.9,1.176 15.9,-8.518 15.458,-8.96 15.44,-8.96 v1(15.1,-9.3)
  Bottom Layer w0.15: P4.5@5.05,4.75 5.125,4.675 5.901,4.675 7.1,3.476 7.1,2.626 7.576,2.15 7.75,2.15 8.075,1.825 8.075,1.775 8.25,1.6 R37_DDC1.1@8.3,1.6 8.8,2.1 9.275,2.1 9.575,2.4 13.6,2.4 13.85,2.65 14.276,2.65 14.277,2.649 14.453,2.649 v1(14.501,2.601)
NetP4_6: P4.6 R38_DDC1.1 U6_DDC1.H1 | length 24.2
  Top Layer w0.15: v1(11.5,-11.4) U6_DDC1.H1@13.2,-11.4
  Layer 2 w0.15: v1(11.075,2.825) 11.1,2.8 11.1,2.7 11.775,2.025 11.775,-5.904 11.1,-6.579 11.1,-11 v1(11.5,-11.4)
  Bottom Layer w0.15: P4.6@5.05,5.25 5.109,5.191 5.809,5.191 7.525,3.475 7.525,3.225 7.65,3.1 R38_DDC1.1@7.7,3.1 ; R38_DDC1.1@7.7,3 7.7,2.95 7.85,2.8 7.9,2.8 8.3,2.4 9.15,2.4 9.55,2.8 11.05,2.8 v1(11.075,2.825)
NetP4_7: P4.7 R39_DDC1.1 U6_DDC1.G1 | length 23.6
  Top Layer w0.15: v1(11.6,-10.4) 11.6,-10.468 11.701,-10.568 11.701,-10.601 12,-10.9 12.9,-10.9 U6_DDC1.G1@13.2,-10.6
  Layer 2 w0.15: v1(11.168,3.367) 11.168,3.333 12.075,2.426 12.075,-6.028 11.452,-6.651 11.452,-10.187 11.6,-10.335 v1(11.6,-10.4)
  Bottom Layer w0.15: P4.7@5.05,5.75 6.216,5.75 7.5,4.466 7.5,4.45 7.55,4.4 7.55,4.35 R39_DDC1.1@7.6,4.3 ; R39_DDC1.1@7.7,4.2 7.7,4.15 7.85,4 7.9,4 8.375,3.525 9.176,3.525 9.401,3.3 10.182,3.3 10.282,3.4 11.075,3.4 11.108,3.367 v1(11.168,3.367)
NetP4_8: P4.8 R40_DDC1.1 U6_DDC1.F1 | length 23.7
  Top Layer w0.15: v1@12.301,-10.399 12.601,-10.399 U6_DDC1.F1@13.2,-9.8
  Layer 2 w0.15: v1(11.1,4.3) 12.375,3.025 12.375,-6.152 11.752,-6.775 11.752,-9.852 v1(12.3,-10.4)
  Bottom Layer w0.15: P4.8@5.05,6.25 6.85,6.25 7.5,5.6 7.55,5.6 7.6,5.55 R40_DDC1.1@7.6,5.5 ; R40_DDC1.1@7.7,5.4 7.7,5.35 7.85,5.2 7.9,5.2 8.3,4.8 9.201,4.8 9.801,4.2 11,4.2 v1(11.1,4.3)
NetP4_9: P4.9 R41_DDC1.1 U6_DDC1.E1 | length 23.6
  Top Layer w0.15: v1(12.2,-8.8) 12.248,-8.848 12.248,-8.98 12.468,-9.2 12.987,-9.2 13.187,-9 U6_DDC1.E1@13.2,-9
  Layer 2 w0.15: v1(10.975,6.025) 11,6 11.6,5.4 11.6,4.3 12.675,3.225 12.675,-6.276 12.052,-6.899 12.052,-8.587 12.2,-8.735 v1(12.2,-8.8)
  Bottom Layer w0.15: P4.9@5.05,6.75 7.55,6.75 R41_DDC1.1@7.7,6.6 7.7,6.55 8.175,6.075 9.901,6.075 10.051,6.225 10.707,6.225 10.907,6.025 v1(10.975,6.025)
NetP4_10: P4.10 R42_DDC1.1 U6_DDC1.D1 | length 24.3
  Top Layer w0.15: v1(12.709,-8.591) 12.709,-8.524 12.799,-8.433 12.799,-8.401 12.952,-8.248 13.152,-8.248 U6_DDC1.D1@13.2,-8.2
  Layer 2 w0.15: v1(11.1,6.975) 11.125,6.975 11.9,6.2 11.9,4.451 12.975,3.376 12.975,-6.401 12.352,-7.024 12.352,-8.285 12.659,-8.591 v1(12.709,-8.591)
  Bottom Layer w0.15: P4.10@5.05,7.25 6.25,7.25 6.8,7.8 R42_DDC1.1@7.7,7.8 7.7,7.75 7.85,7.6 7.9,7.6 8.3,7.2 9.9,7.2 10.275,6.825 10.726,6.825 10.828,6.927 11.052,6.927 v1(11.1,6.975)
NetP4_11: P4.11 R43_DDC1.1 U6_DDC1.C1 | length 24
  Top Layer w0.15: v1(12.8,-7.3) 12.848,-7.348 13.048,-7.348 13.052,-7.352 13.085,-7.352 13.1,-7.368 U6_DDC1.C1@13.1,-7.4
  Layer 2 w0.15: v1(10.675,8.4) 11.1,8.4 12.2,7.3 12.2,4.576 13.275,3.501 13.275,-6.525 12.801,-6.999 v1(12.8,-7.3)
  Bottom Layer w0.15: P4.11@5.05,7.75 6.15,7.75 7.267,8.867 7.667,8.867 R43_DDC1.1@7.7,8.9 ; R43_DDC1.1@7.7,9 7.7,8.95 7.85,8.8 7.9,8.8 8.3,8.4 v1(10.675,8.4)
NetP4_12: P4.12 R44_DDC1.1 U6_DDC1.B1 | length 25
  Top Layer w0.15: U6_DDC1.B1@13.2,-6.6 12.7,-6.1 12.7,-5.5 13.453,-4.747 13.652,-4.747 v1(13.7,-4.699)
  Layer 2 w0.15: v1(10.675,9.575) 10.7,9.55 10.7,9.499 12.5,7.699 12.5,4.7 13.7,3.5 v1(13.7,-4.699)
  Bottom Layer w0.15: P4.12@5.05,8.25 5.062,8.262 5.983,8.262 7.2,9.479 7.2,9.7 7.5,10 7.55,10 R44_DDC1.1@7.7,10.15 ; v1(10.675,9.575) 8.275,9.575 R44_DDC1.1@7.7,10.15 ; R44_DDC1.1@7.7,10.15 R44_DDC1.1@7.7,10.2 R44_DDC1.1@7.7,10.15
NetP4_13: P4.13 R45_DDC1.1 U6_DDC1.A1 | length 33.5
  Top Layer w0.15: U6_DDC1.A1@13.2,-5.8 13.2,-5.787 13.7,-5.288 v1(13.7,-5.275)
  Layer 2 w0.15: v1(12.787,12.275) 12.855,12.275 12.93,12.199 13.001,12.199 15.7,9.5 15.7,4.476 16.2,3.976 16.2,3.051 17.4,1.851 17.4,-1.333 17.624,-1.557 v1(17.624,-1.625)
  Bottom Layer w0.15: P4.13@5.05,8.75 5.1,8.8 5.956,8.8 6.8,9.644 6.8,10.5 7.475,11.175 7.525,11.175 7.6,11.25 R45_DDC1.1@7.6,11.3 ; R45_DDC1.1@7.7,11.4 7.7,11.45 7.875,11.625 7.925,11.625 8.3,12 9.2,12 9.5,12.3 9.7,12.3 10.475,12.3 10.675,12.1 12.587,12.1 12.762,12.275 v1(12.787,12.275) ; v1(13.7,-5.275) 13.725,-5.3 14.801,-5.3 15.225,-4.876 15.225,-2.275 15.7,-1.8 17.424,-1.8 17.6,-1.625 v1(17.624,-1.625)
NetP4_14: P4.14 R46_DDC1.1 U6_DDC1.D3 | length 37.3
  Layer 2 w0.15: v1(11.3,12.8) 11.6,13.1 13.1,13.1 16.3,9.9 16.3,4.8 16.8,4.3 16.8,3.3 18,2.1 18,-0.949 18.4,-1.349 18.4,-2.3 18.048,-2.652 17.848,-2.652 v1(17.8,-2.7)
  Bottom Layer w0.15: P4.14@5.05,9.25 5.1,9.3 5.89,9.3 6.4,9.81 6.4,11 7.65,12.25 7.75,12.25 8.075,12.575 8.075,12.625 8.25,12.8 R46_DDC1.1@8.3,12.8 8.475,12.625 8.588,12.625 8.613,12.6 11.2,12.6 11.3,12.7 v1(11.3,12.8) ; v1(14.525,-7.996) 14.567,-7.996 14.738,-7.825 15.075,-7.825 15.875,-7.025 15.875,-2.557 16.032,-2.4 17.4,-2.4 17.599,-2.599 17.632,-2.599 17.732,-2.7 v1(17.8,-2.7)
NetP4_15: P4.15 R47_DDC1.1 U6_DDC1.C3 | length 35.5
  Top Layer w0.15: U6_DDC1.C3@14.8,-7.4 14.844,-7.4 15.044,-7.2 v1(15.088,-7.2)
  Layer 2 w0.15: v1(12.1,12.6) 12.168,12.6 12.268,12.7 13,12.7 16,9.7 16,4.6 16.5,4.1 16.5,3.176 17.7,1.976 17.7,-1.1 18.1,-1.5 18.1,-1.887 17.9,-2.087 v1(17.9,-2.1)
  Bottom Layer w0.15: P4.15@5.05,9.75 5.1,9.8 5.824,9.8 6,9.976 6,11.1 7.1,12.2 7.1,12.65 7.25,12.8 7.35,12.8 7.525,12.975 7.525,13.025 7.8,13.3 11.401,13.3 11.747,12.954 ; 11.747,12.953 v1(12.1,12.6) ; v1(15.088,-7.2) 15.575,-6.713 15.575,-2.425 15.9,-2.1 v1(17.9,-2.1)
NetP4_16: P4.16 R48_DDC1.1 U6_DDC1.B3 | length 31.2
  Top Layer w0.15: v1(3.95,9.81) 3.475,9.335 3.475,1.925 4.411,0.989 v1(4.411,0.496) ; v1(14.241,-4.588) 14.241,-5.03 14.395,-5.183 14.395,-6.195 U6_DDC1.B3@14.8,-6.6
  Layer 1 w0.15: v1(14.241,-4.588) 14,-4.347 14,-2.4 v1(14.4,-2)
  Bottom Layer w0.15: v1(3.95,9.81) 3.95,10.25 ; v1(4.411,0.496) 4.411,0.489 4.775,0.125 9.075,0.125 9.2,0 10.2,0 10.425,-0.225 12.868,-0.225 13.6,-0.957 13.6,-1.2 v1(14.4,-2) ; P4.16@5.05,10.25 3.95,10.25 ; R48_DDC1.1@5.2,12.8 4.6,12.8 3.8,12 3.8,10.4 3.95,10.25
NetP4_17: P4.17 R49_DDC1.1 U6_DDC1.A3 | length 35.9
  Top Layer w0.15: v1(3.9,0.7) 3.874,0.726 3.874,0.976 3.175,1.675 3.175,12 v1(4.075,12.9) ; v1(14.78,-4.7) 14.8,-4.72 14.8,-5.1 U6_DDC1.A3@14.8,-5.8
  Layer 1 w0.15: v1(14.5,-2.6) 14.5,-2.613 14.3,-2.813 14.3,-4 14.739,-4.439 14.739,-4.659 v1(14.78,-4.7)
  Bottom Layer w0.15: v1(3.9,0.7) 3.9,0.2 4.3,-0.2 8.799,-0.2 8.899,-0.3 10,-0.3 10.225,-0.525 12.743,-0.525 13.3,-1.082 13.3,-1.6 14.252,-2.552 14.452,-2.552 v1(14.5,-2.6) ; v1(4.075,12.9) 4.475,13.3 5.8,13.3 6.075,13.025 6.075,12.975 6.25,12.8 R49_DDC1.1@6.3,12.8 ; P4.17@5.05,10.75 4.188,10.75 4.1,10.838 4.1,11.7 4.6,12.2 5.7,12.2 6.1,12.6 6.1,12.65 6.15,12.7 R49_DDC1.1@6.2,12.7
NetR3_2: R3.2 U2.2 | length 1.7
  Top Layer w0.15: R3.2@17.4,10.1 U2.2@17.4,11.8
NetR6_2: R6.2 U4.20 | length 1.2
  Top Layer w0.15: R6.2@23.9,12.7 24.386,12.214 24.886,12.214 U4.20@24.9,12.2
NetR7_2: R7.2 U4.21 | length 2.4
  Top Layer w0.15: R7.2@22.9,12.7 23.2,12.4 23.7,12.4 24.3,11.8 U4.21@24.9,11.8
NetR8_1: R8.1 U4.68 | length 3.7
  Top Layer w0.15: U4.68@32.7,13 32.912,13 32.947,13.035 32.947,13.247 33.3,13.6 35.4,13.6 35.675,13.325 35.675,13.275 35.75,13.2 R8.1@35.8,13.2
NetR9_1: R9.1 U4.1 | length 1.9
  Top Layer w0.15: U4.1@32,13.7 32.8,13.7 33.2,14.1 R9.1@33.7,14.1
NetR10_1: R10.1 U4.2 | length 3.7
  Top Layer w0.15: U4.2@31.6,13.7 31.635,13.735 31.635,14.111 32.124,14.6 34.3,14.6 R10.1@34.6,14.3
NetR11_1: R11.1 U4.60 | length 6.1
  Top Layer w0.15: U4.60@32.7,9.8 33.2,9.8 33.4,10 33.4,11.024 33.951,11.575 35.575,11.575 36.7,12.7 R11.1@36.7,13
NetR12_2: R12.2 U5.79 | length 1.8
  Top Layer w0.15: R12.2@25.6,-0.4 25.6,-0.45 25.775,-0.625 25.825,-0.625 25.9,-0.7 U5.79@27.22,-0.7
NetR13_2: R13.2 U5.80 | length 1.6
  Top Layer w0.15: R13.2@25.7,-1.35 25.7,-1.275 25.775,-1.2 U5.80@27.22,-1.2
NetR14_1: R14.1 U5.13 | length 3.4
  Top Layer w0.15: U5.13@34.9,-12.88 34.919,-12.861 34.919,-11.85 35.029,-11.739 v1(35.029,-11.671)
  Bottom Layer w0.15: v1(35.029,-11.671) 36.929,-11.671 R14.1@37.1,-11.5
NetTP30_1: TP30.1 U6_DDC1.D8 U6_DDC2.B8 | length 16.7
  Top Layer w0.15: U6_DDC1.D8@18.8,-8.2 v1(19.299,-8.199)
  Bottom Layer w0.15: U6_DDC2.B8@18.8,6.6 19.5,6.6 v1(19.6,6.5) 19.6,6.432 19.801,6.231 19.801,5.401 19.4,5 19.4,-0.574 19.9,-1.074 19.9,-5.8 19.3,-6.4 v1@19.3,-8.199
NetTP35_1: TP35.1 U4.67 U5.25 | length 31.8
  Top Layer w0.15: U4.67@32.7,12.6 33.289,12.6 33.386,12.503 v1(33.45,12.503) ; v1(39.125,-6.6) 39.125,-6.668 39.375,-6.918 39.375,-6.976 39.5,-7.101 39.5,-10.2 40.9,-11.6 U5.25@40.9,-12.88 40.9,-13.36 40.965,-13.425 42.187,-13.425 42.512,-13.1 TP35.1@42.6,-13.1
  Bottom Layer w0.15: v1(33.45,12.503) 33.45,12.435 33.2,12.185 33.2,8.691 33.325,8.566 33.325,4.968 33.275,4.918 33.275,0.326 39.125,-5.524 v1(39.125,-6.6)
NetTP36_1: TP36.1 U4.43 U5.24 | length 26
  Top Layer w0.15: v1(28.793,5.294) 28.796,5.298 28.796,5.896 U4.43@28.8,5.9 ; v1(38.82,-7.12) 39.2,-7.5 39.2,-10.376 40.4,-11.576 U5.24@40.4,-12.88 40.4,-13.8 40.7,-14.1 TP36.1@41.8,-14.1
  Layer 2 w0.15: v1(28.793,5.294) 28.793,4.907 33.4,0.3 v1(33.4,-0.4)
  Bottom Layer w0.15: v1@33.395,-0.395 v1(33.4,-0.4) 38.7,-5.7 38.7,-6.932 38.82,-7.052 v1(38.82,-7.12)
NetTP37_1: TP37.1 U4.4 U5.23 | length 33.6
  Top Layer w0.15: U4.4@30.8,13.7 30.8,14.299 31.098,14.597 v1(31.098,14.627) ; v1@38.2,-7.101 38.9,-7.801 38.9,-10.5 39.9,-11.5 U5.23@39.9,-12.88 39.9,-13.924 TP37.1@40.1,-14.124
  Bottom Layer w0.15: v1(31.098,14.627) 31.138,14.587 31.138,14.362 32.9,12.6 32.9,8.567 33.025,8.442 33.025,5.092 32.975,5.042 32.975,-0.576 38.2,-5.801 v1(38.2,-7.1)
NetU6_DDC1_H7: U6_DDC1.H7 | length 0.1
  Top Layer w0.15: U6_DDC1.H7@18,-11.4 U6_DDC1.H7@18.048,-11.448
NRST: C25.1 J1.1 R17.1 U5.14 | length 23.3
  Top Layer w0.15: v1(25.3,-12.4) 25.324,-12.4 27.324,-14.4 34.6,-14.4 35.335,-13.665 35.335,-12.945 U5.14@35.4,-12.88
  Bottom Layer w0.15: J1.1@22.8,-2.2 22.85,-2.2 22.925,-2.275 22.925,-2.325 23.4,-2.8 C25.1@23.4,-4.2 23.4,-5.819 23.405,-5.824 23.405,-10.605 25.099,-12.299 25.132,-12.299 25.232,-12.4 v1(25.3,-12.4)
R\D\/R\D\S\T\B\: TP25.1 U4.47 U5.1 | length 22.5
  Top Layer w0.15: TP25.1@28.092,-13.008 v1(28.401,-12.701) ; v1(28.401,-12.701) U5.1@28.9,-12.7 ; U4.47@30.4,5.9 v1(30.4,6.6)
  Bottom Layer w0.15: v1(28.401,-12.701) 28.4,-12 27.775,-11.375 27.775,2.975 28.225,3.425 28.676,3.425 30.4,5.149 v1@30.4,6.587
RI: TP14.1 U4.16 U5.33 | length 37.9
  Top Layer w0.15: v1(25.769,14.801) 25.817,14.753 25.817,14.508 26,14.325 U4.16@26,13.7 ; v1(40.4,-6.7) 40.448,-6.748 40.448,-6.948 41.2,-7.7 U5.33@42.58,-7.7 43.7,-7.7 TP14.1@44.1,-7.3
  Bottom Layer w0.15: v1(25.769,14.801) 25.769,14.837 26.307,15.375 31.801,15.375 34.175,13.001 34.175,12.324 34.175,11.975 33.8,11.6 33.8,8.94 33.925,8.815 33.925,4.72 33.875,4.67 33.875,0.575 40.4,-5.95 v1(40.4,-6.7)
RTS: TP9.1 U4.11 U5.15 | length 37
  Top Layer w0.15: U4.11@28,13.7 28.035,13.735 28.035,14.155 28.065,14.185 28.065,14.193 28.772,14.9 30.3,14.9 30.5,14.7 v1(30.5,14.6) ; TP9.1@35.392,-14.43 35.835,-13.987 35.835,-12.945 U5.15@35.9,-12.88 35.9,-7.709 35.6,-7.409 v1(35.6,-7.4)
  Bottom Layer w0.15: v1@30.532,14.5 32.6,12.432 32.6,8.443 32.725,8.318 32.725,5.217 32.675,5.167 32.675,-0.7 37.1,-5.125 37.1,-7.3 36.9,-7.5 35.768,-7.5 35.668,-7.4 v1(35.6,-7.4)
RXD: TP8.1 U4.7 U5.68 | length 16.2
  Top Layer w0.15: v1(29.462,14.416) 29.462,14.348 29.565,14.244 29.565,13.735 U4.7@29.6,13.7 ; U5.68@32.4,2.48 32.4,3.4 33,4 TP8.1@34.1,4 ; TP8.1@34.1,4.1 v1(34.3,4.3)
  Layer 2 w0.15: v1@29.5,14.4 29.5,14.1 29.7,13.9 30,13.9 32.4,11.5 32.4,7.4 34,5.8 34,4.6 v1(34.3,4.3)
SIWU: TP27.1 U4.49 U5.3 | length 24.6
  Top Layer w0.15: TP27.1@26.9,-12.7 27.525,-12.075 27.957,-12.075 28.316,-11.716 29.687,-11.716 29.723,-11.752 29.852,-11.752 v1(29.9,-11.8) U5.3@29.9,-12.88 ; U4.49@31.2,5.9 31.235,5.865 31.235,5.24 v1(31.275,5.2)
  Bottom Layer w0.15: v1@29.887,-11.8 29.049,-11.8 28.375,-11.126 28.375,-1.425 29.9,0.1 29.9,1.9 30.2,2.2 30.2,4.1 31.275,5.175 v1(31.275,5.2)
SPI2_MISO: P5.8 U5.53 | length 11.8
  Top Layer w0.15: U5.53@39.9,2.48 39.9,3.4 40.3,3.8 44.8,3.8 45.6,3 45.6,-0.5 46.326,-1.226 46.4,-1.226 P5.8@46.4,-1.3
SPI2_MOSI: P5.9 U5.54 | length 11.6
  Top Layer w0.15: U5.54@39.4,2.48 39.4,3.4 40.1,4.1 45,4.1 45.9,3.2 45.9,0.524 46.5,-0.076 P5.9@46.5,-0.1
SPI2_NSS: P5.6 U5.51 | length 11.9
  Top Layer w0.15: U5.51@40.9,2.48 40.9,2.692 40.965,2.757 41.177,2.757 41.52,3.1 44.651,3.1 45,2.751 45,-1 45.5,-1.5 45.5,-2.9 46.326,-3.726 46.4,-3.726 P5.6@46.5,-3.826
SPI2_SCK: P5.7 U5.52 | length 12.1
  Top Layer w0.15: U5.52@40.4,2.48 40.449,2.529 40.449,3.349 40.6,3.5 44.676,3.5 45.3,2.876 45.3,-0.8 45.8,-1.3 45.8,-1.9 46.308,-2.408 46.332,-2.408 46.424,-2.5 P5.7@46.6,-2.5
SPI_MOSI: TP39.1 U5.31 | length 2.2
  Top Layer w0.15: U5.31@42.58,-8.7 43.6,-8.7 44,-9.1 TP39.1@44.6,-9.1
TXD: TP7.1 U4.6 U5.69 | length 15.5
  Top Layer w0.15: U4.6@30,13.7 30.004,13.704 30.004,14.35 v1(30.008,14.354) ; U5.69@31.9,2.48 31.965,2.545 31.965,3.389 33.551,4.976 33.676,4.976 TP7.1@33.8,5.1 ; TP7.1@33.9,5.1 33.9,5.276 34.092,5.468 34.092,5.492 34.4,5.8 v1(34.425,5.8)
  Layer 2 w0.15: v1(30.008,14.354) 32.7,11.662 32.7,7.524 v1(34.425,5.8)
USART3_RX: P5.5 U5.47 | length 6.9
  Top Layer w0.15: U5.47@42.58,-0.7 44.2,-0.7 45.2,-1.7 45.2,-3.6 P5.5@46.6,-5
USART3_TX: P5.4 U5.46 | length 7.9
  Top Layer w0.15: U5.46@42.58,-1.2 44.2,-1.2 44.9,-1.9 44.9,-4.6 P5.4@46.7,-6.4
USB_N: J2.A7 J2.B7 R52.2 R54.2 | length 6.5
  Top Layer w0.2: R54.2@38.1,6.4 v1(38.1,7.1) ; R52.2@38.2,9.6 38.25,9.6 38.3,9.55 J2.A7@39.42,9.55 39.47,9.5 40.1,9.5 J2.B7@40.5,9.1
  Layer 2 w0.2: v1(38.1,7.1) 39.9,8.9 J2.B7@40.6,8.9
USB_P: J2.A6 J2.B6 R53.2 R55.2 | length 9
  Top Layer w0.2: R55.2@38.1,8.1 38.183,8.183 38.183,8.483 38.3,8.6 ; R53.2@38.1,11.5 38.1,11.45 37.95,11.3 37.9,11.3 37.6,11 37.6,10.8 v1(37.5,10.7) 37.5,10.646 37.6,10.546 37.6,9.396 37.746,9.25 37.75,9.25 38.3,8.7 38.3,8.6 ; J2.A6@39.42,9.05 39.37,9 38.7,9 38.3,8.6
  Layer 2 w0.2: v1(37.5,10.7) 38.5,9.7 J2.B6@40.68,9.7
VREF_CURR: R4.2 R18_DDC1.2 R18_DDC2.2 R19_DDC1.2 R19_DDC2.2 R20_DDC1.2 R20_DDC2.2 R21_DDC1.2 R21_DDC2.2 R22_DDC1.2 R22_DDC2.2 R23_DDC1.2 R23_DDC2.2 R24_DDC1.2 R24_DDC2.2 R25_DDC1.2 R25_DDC2.2 R26_DDC1.2 R26_DDC2.2 R27_DDC1.2 R27_DDC2.2 R28_DDC1.2 R28_DDC2.2 R29_DDC1.2 R29_DDC2.2 R30_DDC1.2 R30_DDC2.2 R31_DDC1.2 R31_DDC2.2 R32_DDC1.2 R32_DDC2.2 R33_DDC1.2 R33_DDC2.2 R34_DDC1.2 R34_DDC2.2 R35_DDC1.2 R35_DDC2.2 R36_DDC1.2 R36_DDC2.2 R37_DDC1.2 R37_DDC2.2 R38_DDC1.2 R38_DDC2.2 R39_DDC1.2 R39_DDC2.2 R40_DDC1.2 R40_DDC2.2 R41_DDC1.2 R41_DDC2.2 R42_DDC1.2 R42_DDC2.2 R43_DDC1.2 R43_DDC2.2 R44_DDC1.2 R44_DDC2.2 R45_DDC1.2 R45_DDC2.2 R46_DDC1.2 R46_DDC2.2 R47_DDC1.2 R47_DDC2.2 R48_DDC1.2 R48_DDC2.2 R49_DDC1.2 R49_DDC2.2 R50_DDC1.2 R50_DDC2.2 R51_DDC1.2 R51_DDC2.2 TP5.1 U3.6 U3.7 U6_DDC1.A6 U6_DDC1.B6 U6_DDC2.A6 U6_DDC2.B6 | length 97.5
  Top Layer w0.15: R48_DDC2.2@5.3,-14 R49_DDC2.2@6.3,-14 R47_DDC2.2@7.3,-14 R46_DDC2.2@8.3,-14 ; R35_DDC2.2@5.3,-0.6 R34_DDC2.2@6.3,-0.6 R36_DDC2.2@7.3,-0.6 R37_DDC2.2@8.3,-0.6 8.375,-0.675 v1(8.699,-0.675) ; R32_DDC2.2@5.3,0.6 R33_DDC2.2@6.3,0.6 R31_DDC2.2@7.3,0.6 R30_DDC2.2@8.3,0.6 v1@8.7,0.6 ; R19_DDC2.2@5.3,13.8 R18_DDC2.2@6.3,13.8 R20_DDC2.2@7.3,13.8 R21_DDC2.2@8.3,13.8 v1(8.7,13.8) ; R46_DDC2.2@8.477,-13.877 8.752,-13.877 v1(8.8,-13.925) ; R45_DDC2.2@8.7,-11.5 8.7,-11.4 v1(9.2,-11.4) ; R44_DDC2.2@8.7,-10.2 v1(9.2,-10.2) ; R43_DDC2.2@8.7,-9 v1(9.2,-9) ; R42_DDC2.2@8.7,-7.8 v1(9.2,-7.8) ; R41_DDC2.2@8.7,-6.6 v1(9.2,-6.6) ; R39_DDC2.2@8.7,-4.2 v1(9.2,-4.2) ; R38_DDC2.2@8.7,-3 9.175,-3 v1(9.2,-3.025) ; R29_DDC2.2@8.7,3 v1(9.1,3) v1@9.2,3 ; R28_DDC2.2@8.7,4.2 v1@9.2,4.2 ; R27_DDC2.2@8.7,5.4 v1@9.2,5.4 ; R26_DDC2.2@8.7,6.6 8.719,6.581 v1(9.097,6.581) ; R25_DDC2.2@8.7,7.8 v1@9.2,7.8 ; R24_DDC2.2@8.7,9 v1@9.2,9 ; R23_DDC2.2@8.7,10.2 v1@9.2,10.2 ; R22_DDC2.2@8.7,11.4 v1@9.2,11.4 ; R40_DDC2.2@8.801,-5.501 v1(9.199,-5.501) ; v1(11.229,-1.829) 11.229,-1.879 11.45,-2.1 R51_DDC2.2@11.5,-2.1 ; R51_DDC2.2@11.6,-2.2 11.775,-2.375 11.888,-2.375 11.913,-2.4 13.2,-2.4 14.175,-1.425 14.75,-1.425 14.825,-1.5 v1@15.25,-1.5 ; v1@15.275,-1.475 17.9,-4.1 17.9,-4.949 v1(17.925,-4.974) 17.925,-5 17.8,-5 17.238,-5.562 17.238,-5.762 U6_DDC1.A6@17.2,-5.8 U6_DDC1.B6@17.2,-6.6 ; v1(16.953,4.748) 16.953,4.703 16.8,4.55 16.8,2.5 16.8,1.6 18.1,0.3 18.3,0.3 ; v1@16.975,4.725 17.3,5.05 R50_DDC2.2@17.3,5.1 ; U3.6@18.725,-0.325 U3.6@18.737,-0.337 ; U3.6@18.725,-0.2 U3.7@18.725,0.325
  Layer 1 w0.15: v1(8.7,13.8) 9.1,13.4 v1(9.1,11.4)
  Layer 2 w0.15: v1(8.8,-13.925) 8.8,-13.883 9.2,-13.483 v1(9.2,-11.4) v1(9.2,-10.2) v1(9.2,-9) v1(9.2,-7.8) v1(9.2,-6.6) v1(9.199,-5.501) v1(9.2,-4.2) v1(9.2,-3.025) 8.8,-2.625 v1@8.8,-0.7 ; v1@8.8,-0.506 v1(8.8,0.6) 8.8,1.101 9.1,1.401 v1(9.1,3) v1(9.1,4.2) v1(9.1,5.4) 9.098,5.402 9.098,6.579 v1(9.097,6.581) ; v1@9.1,6.6 v1(9.1,7.8) v1(9.1,9) v1(9.1,10.2) v1(9.1,11.4)
  Bottom Layer w0.15: R19_DDC1.2@5.3,-13.8 R18_DDC1.2@6.3,-13.8 R20_DDC1.2@7.3,-13.8 R21_DDC1.2@8.3,-13.8 8.425,-13.925 v1(8.8,-13.925) ; R32_DDC1.2@5.3,-0.7 R33_DDC1.2@6.3,-0.7 R31_DDC1.2@7.3,-0.7 R30_DDC1.2@8.3,-0.7 ; R35_DDC1.2@5.3,0.6 R34_DDC1.2@6.3,0.6 R36_DDC1.2@7.3,0.6 R37_DDC1.2@8.3,0.6 v1(8.8,0.6) ; R48_DDC1.2@5.3,13.8 R49_DDC1.2@6.3,13.8 R47_DDC1.2@7.3,13.8 R46_DDC1.2@8.3,13.8 R46_DDC1.2@8.475,13.625 ; R30_DDC1.2@8.35,-0.65 8.375,-0.675 v1@8.755,-0.675 ; R22_DDC1.2@8.7,-11.4 v1(9.2,-11.4) ; R23_DDC1.2@8.7,-10.2 v1(9.2,-10.2) ; R24_DDC1.2@8.7,-9 v1(9.2,-9) ; R25_DDC1.2@8.7,-7.8 v1(9.2,-7.8) ; R26_DDC1.2@8.7,-6.6 v1(9.2,-6.6) ; R28_DDC1.2@8.7,-4.2 v1(9.2,-4.2) ; R29_DDC1.2@8.7,-3 v1@9.2,-3 ; v1@8.755,-0.7 9.8,-0.7 10.9,-1.8 11.2,-1.8 11.4,-1.8 R50_DDC1.2@11.5,-1.9 ; R27_DDC1.2@8.801,-5.501 v1(9.199,-5.501) ; R38_DDC1.2@8.8,3 v1(9.1,3) v1@9.2,3 ; R39_DDC1.2@8.8,4.2 v1(9.1,4.2) v1@9.2,4.2 ; R40_DDC1.2@8.8,5.4 v1(9.1,5.4) v1@9.2,5.4 ; R41_DDC1.2@8.8,6.6 8.819,6.581 v1(9.097,6.581) ; R42_DDC1.2@8.8,7.8 v1(9.1,7.8) v1@9.2,7.8 ; R43_DDC1.2@8.8,9 v1(9.1,9) v1@9.2,9 ; R44_DDC1.2@8.8,10.2 v1(9.1,10.2) v1@9.2,10.2 ; R45_DDC1.2@8.8,11.4 v1(9.1,11.4) v1@9.2,11.4 ; v1(11.229,-1.829) v1@11.229,-1.8 ; v1(15.175,-1.5) 15.243,-1.5 15.443,-1.3 16.7,-1.3 17.075,-0.925 17.125,-0.925 17.3,-0.75 R4.2@17.3,-0.7 17.3,-0.65 17.475,-0.475 17.525,-0.475 18,0 v1(18.5,0) ; v1(16.953,4.748) 16.953,4.816 17.2,5.063 U6_DDC2.A6@17.2,5.8 U6_DDC2.B6@17.2,6.6 ; R51_DDC1.2@17.8,-4.55 17.925,-4.675 v1(17.925,-4.974)
VREF_DDC: R5.2 TP6.1 U3.1 U3.2 | length 3.3
  Top Layer w0.15: R5.2@12.7,0.5 12.75,0.5 12.925,0.325 14.275,0.325 14.275,0.9 U3.1@14.2,0.975
  Top Layer w0.2: R5.2@12.7,0.6 TP6.1@12.7,1.6
VUSB: C1.1 C3.1 C24.1 D5.5 D6.5 FB2.1 R1.2 TP2.1 U1.3 | length 27.6
  Top Layer w0.15: R1.2@21.8,14.1 21.85,14.1 21.975,14.225 21.975,14.275 22.5,14.8 v1(23.5,14.8) ; v1(34.225,10.692) 34.229,10.696 34.496,10.696 D5.5@34.5,10.7 ; v1(34.35,7.2) D6.5@34.7,7.2 ; C24.1@35.8,5.1 36.5,5.1 FB2.1@36.6,5 ; TP2.1@36.512,4.185 36.512,4.675 36.637,4.8 FB2.1@36.7,4.8
  Bottom Layer w0.15: v1(23.5,14.8) 24.9,14.8 25.775,15.675 31.925,15.675 34.475,13.125 34.475,11.775 34.225,11.525 v1(34.225,10.692) 34.225,7.393 34.302,7.315 34.302,7.202 v1@34.3,7.2 ; v1(34.35,7.2) U1.3@34.8,7.2 ; U1.3@35.85,7.5 35.85,5.618 35.9,5.568 v1(35.9,5.5) ; U1.3@37,7.8 37.125,7.925 37.3,8.1 C3.1@38.1,8.1 38.275,7.925 38.388,7.925 38.413,7.9 C1.1@39.2,7.9
W\R\: TP26.1 U4.48 U5.2 | length 26
  Top Layer w0.15: TP26.1@28.1,-13.8 28.276,-13.8 28.376,-13.9 29.2,-13.9 29.351,-13.749 29.351,-12.929 U5.2@29.4,-12.88 ; TP26.1@28.2,-13.6 TP26.1@28.2,-13.54 ; U4.48@30.8,5.9 30.814,5.914 30.814,6.414 v1(31.1,6.7)
  Bottom Layer w0.15: v1(28.1,-13.5) 28.4,-13.5 29.1,-12.8 29.1,-12.276 28.075,-11.251 28.075,1.811 28.264,2 28.7,2 29.1,2.4 29.1,3.424 30.7,5.024 30.7,6.287 31.1,6.687 v1(31.1,6.7)
pads on no net: F26. F27. F28. F29. F30. J2. J2.A2 J2.A3 J2.A5 J2.A8 J2.A10 J2.A11 J2.B2 J2.B3 J2.B5 J2.B8 J2.B10 J2.B11 U4.5 U4.17 U4.18 U4.19 U4.22 U4.23 U4.24 U4.32 U4.33 U4.50 U4.52 U4.53 U4.54 U4.56 U4.57 U4.61 U4.62 U4.63 U4.64 U4.65 U5.4 U5.5 U5.7 U5.22 U5.28 U5.34 U5.35 U5.37 U5.38 U5.39 U5.40 U5.41 U5.42 U5.43 U5.45 U5.55 U5.56 U5.57 U5.60 U5.61 U5.62 U5.63 U5.65 U5.66 U5.67 U5.77 U5.89 U5.90 U5.91 U5.95 U5.96 U6_DDC1.E8 U6_DDC2.E8 X1.2 X1.4 X3.2 X3.4
copper on no net:
  other v1: 10.2,-11.4 10.6,11.3

## Polygon pours and split planes (outlines as drawn)
GND on Layer 1 "GND_L02_P001" (solid, remove dead copper, pour order 1): 1.5,-16 cw(c1.5,-14.5) 0,-14.5 0,14.4 cw(c1.6,14.4) 1.6,16 46,16 cw(c46,14) 48,14 48,-14 cw(c46,-14) 46,-16
GND on Bottom Layer "GND_L04_P002" (solid, remove dead copper, pour order 2): 1.5,-16 cw(c1.5,-14.5) 0,-14.5 0,14.4 cw(c1.6,14.4) 1.6,16 46,16 cw(c46,14) 48,14 48,-14 cw(c46,-14) 46,-16
GND on Top Layer "GND_L01_P000" (solid, remove dead copper, pour order 0): 1.5,-16 cw(c1.5,-14.5) 0,-14.5 0,14.4 cw(c1.6,14.4) 1.6,16 46,16 cw(c46,14) 48,14 48,-14 cw(c46,-14) 46,-16
3V3 on Layer 2 "3V3_L03_P003" (solid, remove dead copper, pour order 3): 1.5,-16 cw(c1.5,-14.5) 0,-14.5 0,14.4 cw(c1.6,14.4) 1.6,16 46,16 cw(c46,14) 48,14 48,-14 cw(c46,-14) 46,-16

## Keep-outs
Keep-Out Layer:
  the board outline again, w0.2

## Silkscreen, mask and mechanical layers (free items; w line width, h text height)
Top Overlay:
  text "v1.3 - Apr 22" at 2.306,-15.558 h1.3
  text "16MV1" at 13.4,-15.6 h2.5